# Altium PCB LSS-P-PCB-B v3.4.PcbDoc (part 3 of 3)
Units mil, origin at the board's own origin, x right, y up, seen from the top; angles counter-clockwise.
Board outline 2702.17 x 2795.23 mil, 4 copper layers (Top Layer, Power, GND, Bottom Layer), stack 62.08 mil thick; 111 components, 108 nets, 410 pads, 256 vias.
Unrouted connection lines stored in the file: 1.
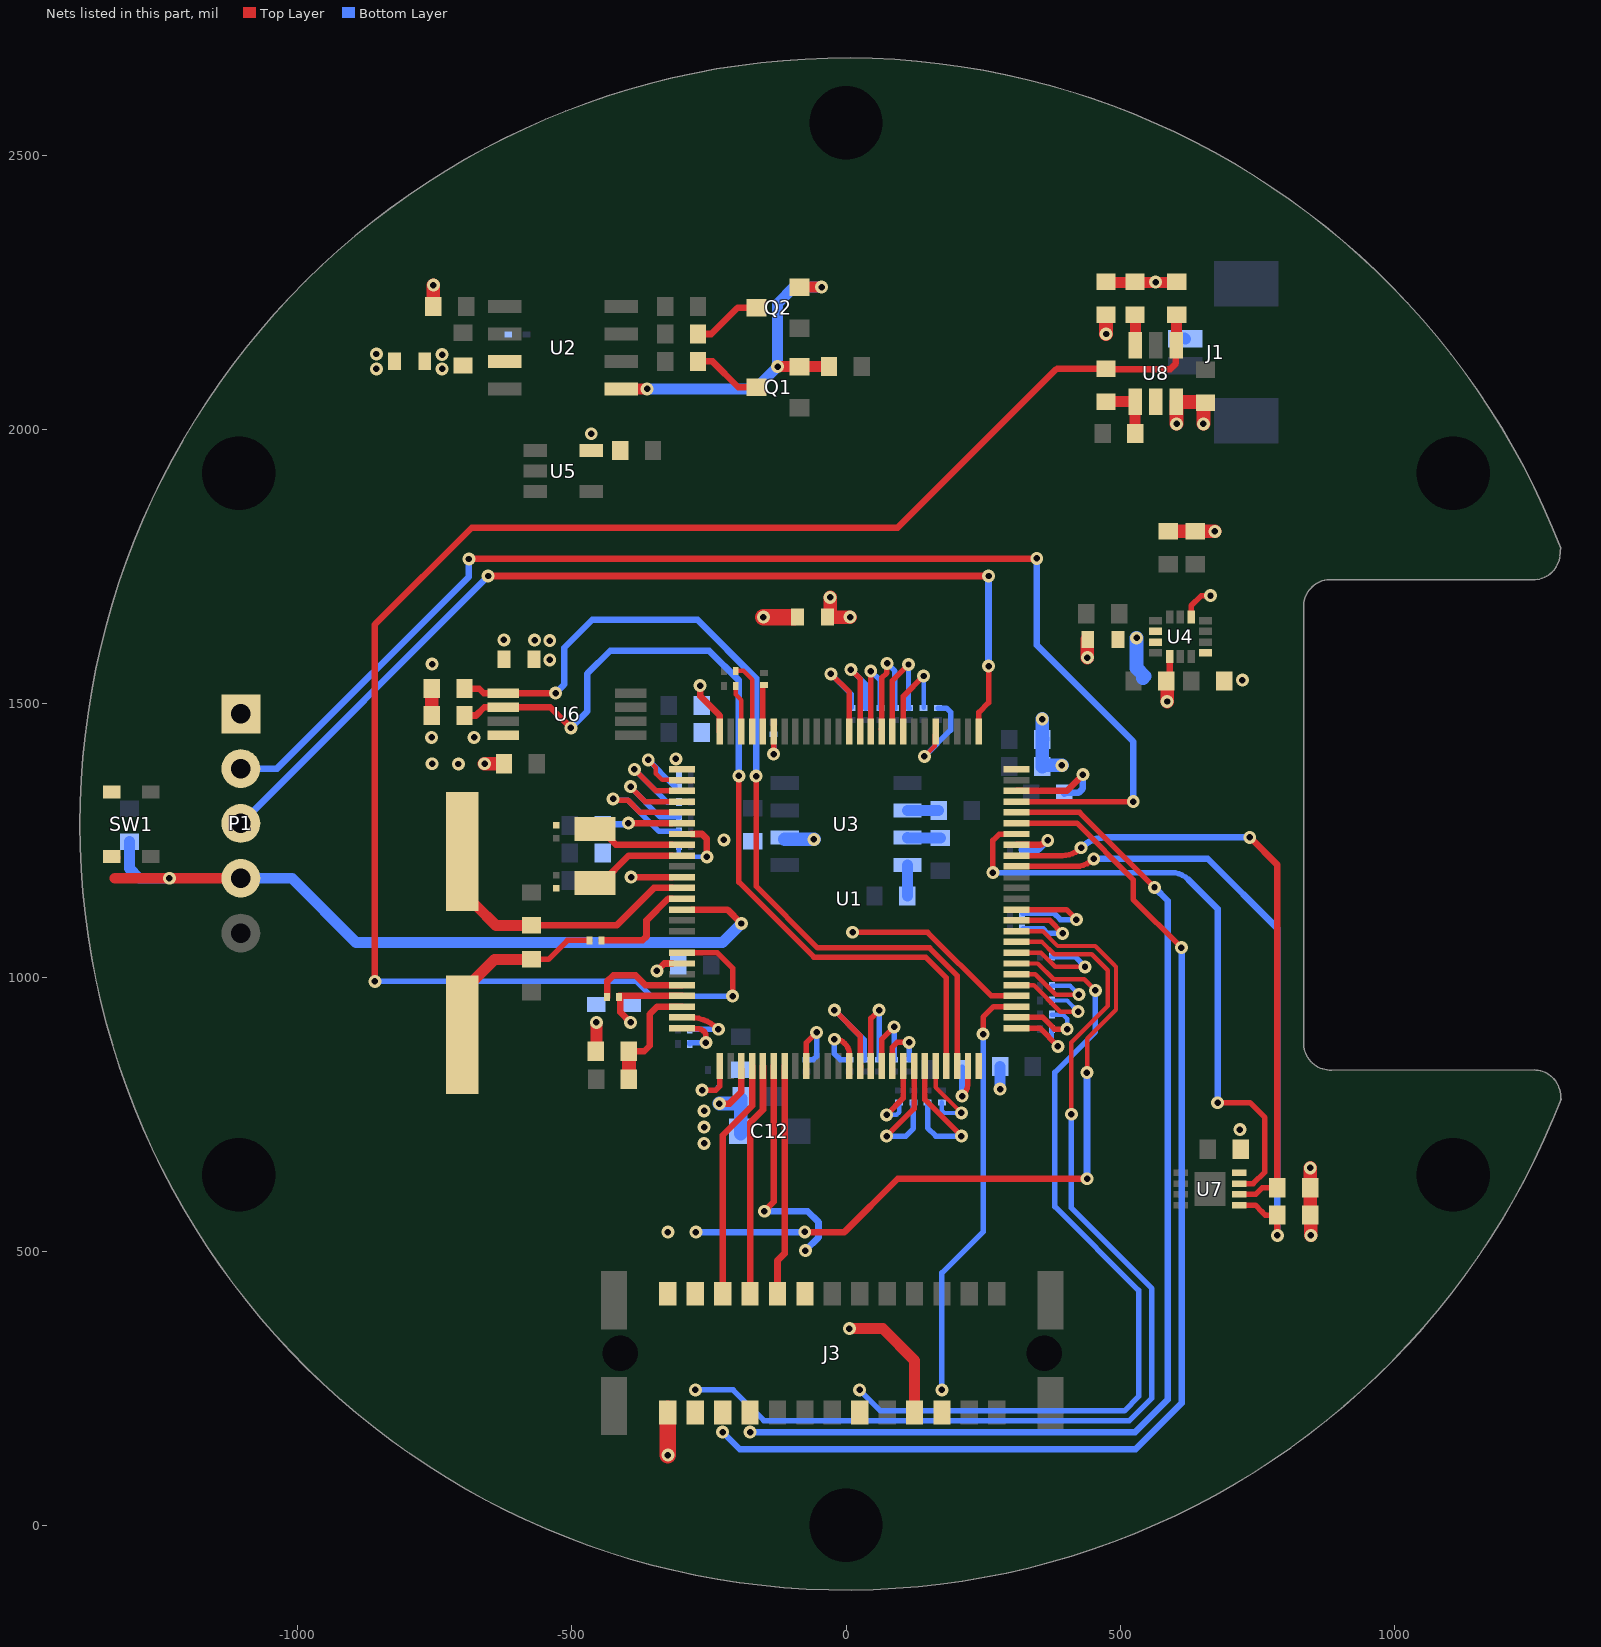
[diagram p4: the nets of this part, all layers, seen from the top]

## Via types
v1: diameter 23.62, hole 11.81, Top Layer to Bottom Layer, tented both sides, 256 vias

## Nets (pads, with @x,y where several pads share a name; then routed paths per layer and width w, separated by ;. In a path a pad name is that pad's centre, name@x,y a point inside that pad or via, vN(x,y) a via of type N, cw(c..) or ccw(c..) an arc to the next point about the centre after c; other vN are vias at no path point) (continued)
IN-: R50.1 R52.1 U8.4 | length 113.3
  Top Layer w20: R52.1@473,2050 R52.1@474.4,2050 474.47,2049.93 527.93,2049.93 U8.4@528,2049.87 527.5,2049.37 527.5,1992.5 R50.1@527,1992
LED_B: J3.A8 U1.57 | length 1534.3
  Top Layer w8: U1.57@311.12,1025.05 349.95,1025.05 378.81,996.19 434.66,996.19 v1(454.85,976)
  Bottom Layer w10: v1(25,246.98) 62.98,209.01 507.64,209.01 534,235.37 534,428.6 380.97,581.63 380.97,826.55 454.85,900.43 v1(454.85,976)
LED_G: J3.B2 U1.60 | length 1375.7
  Top Layer w8: U1.60@307.16,1084.1 U1.60@311.12,1084.1 358.9,1084.1 386,1057 454.85,1057 488,1023.85 488,1023.47 492.66,1018.82 492.66,940.66 440,888 v1@440,826.04
  Top Layer w12: v1(-75.3,535.3) -75,535 -3,535 94.31,632.31 v1(439.8,632.31)
  Bottom Layer w12: v1(-274,535) -75.3,535 v1(-75.3,535.3) ; v1(439.8,632.31) 439.71,632.41 439.71,825.95 v1@439.8,826.04
  other v1: 439.61,826.04
LED_R: J3.A2 U1.59 | length 1930.3
  Top Layer w8: U1.59@311.12,1064.42 357.37,1064.42 379.79,1042 448.26,1042 477.66,1012.6 477.66,947.47 411,880.81 v1(411,750)
  Bottom Layer w10: v1(-275,246.98) -205.89,246.98 -149.91,191 517,191 558,232 558,432 411,579 v1(411,750)
MISO: J3.B6 U1.31 | length 441.1
  Top Layer w12: v1(-149,573) -131.8,590.2 U1.31@-131.8,838.04
  Bottom Layer w12: v1(-149,573) -70,573 -50.19,553.19 -50.19,525.31 v1(-74.25,501.25)
MOSI: J3.B5 U1.32 | length 420.9
  Top Layer w12: J3.B5@-125,422.53 -125,483.1 -112.11,495.99 U1.32@-112.11,838.04
NetC13_2: C13.2 U1.49 | length 113.7
  Top Layer w10: v1@212,785.35 v1(212,783.21) ccw(c186.57,808.65) 222.54,808.65 U1.49@222.54,838.04
  Bottom Layer w10: C13.2@212,835.53 C13.2@216,831.53
  Bottom Layer w12: v1(212,783.21) C13.2@212,831.53
NetC14_2: C14.2 U1.73 | length 196.7
  Top Layer w12: U1.73@311.12,1340.01 402.67,1340.01 v1(432.19,1369.53)
  Bottom Layer w12: C14.2@398,1334.53 399.65,1336.18 423.97,1336.18 432.19,1344.4 v1(432.19,1369.53)
NetC17_2: C17.2 R3.2 X1.2 | length 349.7
  Top Layer w10: C17.2@-574,1032.53 -543.12,1032.53 -508.31,1067.34 R3.2@-467.85,1067.34
  Top Layer w20: X1.2@-700,894.88 -700,973.62 -641.09,1032.53 C17.2@-574,1032.53
NetQ1_3: Q1.3 R7.1 | length 126.1
  Top Layer w12: R7.1@-270,2123.53 -243.53,2123.53 -196.53,2076.53 Q1.3@-163.37,2076.53
NetQ2_3: Q2.3 R8.1 | length 124.5
  Top Layer w12: R8.1@-270,2173.53 -245.74,2173.53 -197.74,2221.53 Q2.3@-165.34,2221.53
NetR1_1: R1.1 U1.21 | length 177.5
  Top Layer w12: R1.1@-435.83,963.53 -435.83,992.17 -424.47,1003.53 -384.09,1003.53 -366.24,985.68 U1.21@-299.12,985.68
NetR6_1: R6.1 U1.51 | length 125.1
  Top Layer w10: U1.51@311.12,906.94 353.7,906.94 v1(386.64,874)
  Bottom Layer w8: R6.1@375.65,905.4 375.65,884.98 v1(386.64,874)
NetR9_2: R9.2 U1.24 | length 124
  Top Layer w10: U1.24@-299.12,926.62 -285.2,926.62 cw(c-285.2,852.8) v1@-233,905 ; v1@-233.84,910.65 v1@-233.77,910.58
  Bottom Layer w10: R9.2@-285,905.03 v1@-233.03,905.03
  other v1: -232.77,905.03
NetR10_2: R10.2 U1.25 | length 80
  Top Layer w10: U1.25@-285,906 -271.07,906 cw(c-271.07,888.93) -259,901 cw(c-267.25,892.75) -255.58,892.75 v1(-255.58,880.53)
  Bottom Layer w10: R10.2@-285,878.53 -285,880.21 -284.68,880.53 v1(-255.58,880.53)
NetR11_2: R11.2 U1.26 | length 129.8
  Top Layer w8: U1.26@-230.22,831.04 U1.26@-230,830.82
  Top Layer w10: v1(-262.59,793.93) -237.41,793.93 -230,801.34 U1.26@-230,830.82
  Bottom Layer w8: v1(-262.59,793.93) -239.07,793.93 -230.31,802.69 -230.31,827.76 -230.22,827.84 R11.2@-230.22,831.04
NetR12_1: R12.1 U1.52 | length 150.7
  Top Layer w10: U1.52@311.12,926.62 359.13,926.62 380.35,905.4 v1(403.33,905.4)
  Bottom Layer w8: R12.1@375.65,931.66 396.04,931.66 403.33,924.38 v1(403.33,905.4)
NetR13_2: R13.2 U1.34 | length 134.2
  Top Layer w10: U1.34@-72.74,838.04 -72.74,880.28 v1(-53.68,899.34)
  Bottom Layer w10: R13.2@-71.68,849.84 R13.2@-72,849.53 -59.85,849.53 -53.68,855.7 v1(-53.68,899.34)
NetR14_2: R14.2 U1.68 | length 116.2
  Top Layer w12: U1.68@311.12,1241.58 348.89,1241.58 ccw(c348.89,1268.63) v1(368.02,1249.51) v1@364.88,1249.51
  Bottom Layer w12: R14.2@321,1232.53 351.04,1232.53 v1(368.02,1249.51)
NetR17_2: R17.2 U1.80 | length 176.7
  Top Layer w8: v1(143,1403) 161.57,1421.57 161.57,1442.33 U1.80@164,1444.76
  Bottom Layer w10: v1(143,1403) 190.81,1450.81 190.81,1483.46 183.17,1491.1 R17.2@168,1491.1
NetR18_1: R18.1 U1.95 | length 78.2
  Top Layer w8: v1(-132,1407) -131,1408 v1@-131.8,1408.8
  Top Layer w10: v1@-131.8,1408.8 U1.95@-131.8,1448.28
  Bottom Layer w10: v1(-132,1407) R18.1@-132,1443.17
NetR19_2: R19.2 U1.7 | length 131.5
  Top Layer w12: U1.7@-281.5,1261.27 -262.74,1261.27 -253.81,1252.34 v1(-253.81,1219.72)
  Bottom Layer w8: R19.2@-304.83,1239.53 -304.83,1225.36 -299.19,1219.72 v1(-253.81,1219.72)
NetR20_2: R20.2 U1.97 | length 130.1
  Top Layer w8: R20.2@-200,1559 -187,1559 -170.83,1542.83 U1.97@-170.83,1448.61
NetR21_2: R21.2 U1.98 | length 87.2
  Top Layer w8: R21.2@-201.17,1531 -201.17,1515.72 -191,1505.54 U1.98@-191,1448
NetR22_1: R22.1 U1.83 | length 172.9
  Top Layer w10: U1.83@104.43,1450.1 104.43,1512.29 v1(141.67,1549.53)
  Bottom Layer w8: R22.1@141.67,1491.53 v1(141.67,1549.53)
NetR23_2: R23.2 U1.1 | length 3.6
  Bottom Layer w8: v1@-309.4,1394.9 v1@-309.4,1398.46
  other v1: -310.4,1398.46
NetR24_1: R24.1 U1.84 | length 212
  Top Layer w10: U1.84@84.74,1451.27 84.74,1541.27 v1(114,1570.53)
  Bottom Layer w10: v1(114,1570.53) 114,1491.42 114.32,1491.1 R24.1@115.33,1491.1
NetR25_2: R25.2 U1.2 | length 151.7
  Top Layer w8: v1(-360.78,1396.37) -347.01,1382.6 -347.01,1371.54 -335.47,1360 U1.2@-300.03,1360
  Bottom Layer w10: v1(-360.78,1396.37) -315.41,1351 -314,1351 -312.73,1349.73 -312.73,1347.73
NetR26_1: R26.1 U1.85 | length 212
  Top Layer w10: U1.85@64,1452.53 65.06,1453.58 65.06,1545.62 74.52,1555.09 74.52,1572.29 v1(74.88,1572.65)
  Bottom Layer w10: v1(74.88,1572.65) 89,1558.52 R26.1@89,1491.1
NetR28_2: R28.2 U1.3 | length 214.5
  Top Layer w10: v1(-386,1379) -347.01,1340.01 U1.3@-292.41,1340.01
  Bottom Layer w10: v1(-386,1379) -326.24,1319.24 R28.2@-306.01,1319.24
NetR29_1: R29.1 U1.86 | length 184.8
  Top Layer w10: U1.86@45.37,1448.28 v1@45.37,1558.3
  Bottom Layer w10: v1(45.08,1558.59) 62.67,1541.01 R29.1@62.67,1491.1
NetR30_2: R30.2 U1.4 | length 224.7
  Top Layer w10: v1(-392.96,1347.91) -393.28,1347.6 -393.28,1346.94 -366.66,1320.32 U1.4@-292.63,1320.32
  Bottom Layer w10: v1(-392.96,1347.91) -393.28,1347.6 -393.28,1346.94 -339,1292.67 -305.15,1292.67 R30.2@-305,1292.81
NetR31_1: R31.1 U1.87 | length 196.7
  Top Layer w10: v1(9,1561) 26,1544 U1.87@26,1452.53
  Bottom Layer w10: v1(9,1561) 36.33,1533.67 R31.1@36.33,1491.1
NetR32_2: R32.2 U1.5 | length 270.3
  Top Layer w10: v1(-425,1325.24) -422.95,1323.19 -398.19,1323.19 -375.64,1300.64 U1.5@-309.57,1300.64
  Bottom Layer w10: v1(-425,1325.24) -422.95,1323.19 -398.19,1323.19 -341.1,1266.1 R32.2@-304.83,1266.1
NetR33_1: R33.1 U1.88 | length 193.1
  Top Layer w10: v1(-27.52,1553.52) 6,1520 6,1452.53 U1.88@5,1451.53
  Bottom Layer w10: v1(-27.52,1553.52) 10,1516 R33.1@10,1492.27
NetR34_2: R34.2 U1.38 | length 122.4
  Top Layer w10: v1(-21.09,886.85) cw(c-21.09,859.75) 6,859.56 6,859.5 U1.38@6,838.04
  Bottom Layer w10: v1(-21.09,886.85) -21.09,860.17 -10.45,849.53 R34.2@6,849.53
NetR35_1: R35.1 U1.55 | length 189
  Top Layer w8: U1.55@311.12,985.68 342.32,985.68 390.79,937.21 v1(423.64,937.21)
  Bottom Layer w8: R35.1@375.65,957.53 403.33,957.53 v1(423.64,937.21)
NetR36_2: R36.2 U1.39 | length 242.3
  Top Layer w10: v1(-21.09,940) 25.68,893.22 U1.39@25.68,838.04
  Top Layer w12: U1.39@25.68,831.04 U1.39@25.68,838.04
  Bottom Layer w8: R36.2@33,850.84 33.25,850.59 R36.2@33.25,849.53
  Bottom Layer w10: v1(-21.09,940) 33,885.91 R36.2@33,849.84
NetR37_1: R37.1 U1.56 | length 183.8
  Top Layer w8: U1.56@312.08,1005.53 345.27,1005.53 382.6,968.19 424.49,968.19 v1(424.71,968.41)
  Bottom Layer w8: R37.1@375.65,984.19 408.92,984.19 v1(424.71,968.41)
NetR38_2: R38.2 U1.40 | length 205.7
  Top Layer w10: U1.40@45.46,831.13 45.46,924.96 v1(60.5,940)
  Top Layer w12: U1.40@45.37,831.04 U1.40@45.46,831.13
  Bottom Layer w10: R38.2@60.5,849.53 v1(60.5,940)
NetR39_1: R39.1 U1.96 | length 84.9
  Top Layer w10: U1.96@-151.48,1448.28 R39.1@-151.48,1533.17
NetR40_2: R40.2 U1.41 | length 147.5
  Top Layer w10: U1.41@65.06,831.04 65.06,886.65 v1(87.75,909.34)
  Bottom Layer w10: R40.2@87.75,849.53 v1(87.75,909.34)
NetR41_1: R41.1 U1.58 | length 203.6
  Top Layer w8: U1.58@311.12,1044.73 355.84,1044.73 381.57,1019 v1(436.01,1019)
  Bottom Layer w10: R41.1@375.65,1037.53 417.48,1037.53 434.99,1020.01 435.49,1019.51 v1(436.01,1019)
NetR42_2: R42.2 U1.42 | length 80.8
  Top Layer w10: U1.42@84.74,855.66 84.74,872.37 93.37,881 v1(115,881)
  Bottom Layer w10: R42.2@115,850.7 v1(115,881)
NetR43_2: R43.2 U1.43 | length 137.1
  Top Layer w10: v1(74,749) 104.43,779.43 U1.43@104.43,830.53
  Bottom Layer w8: v1(74,749) 92.31,749 97,753.69 R43.2@97,771.7
NetR44_2: R44.2 U1.44 | length 244.2
  Top Layer w10: v1(74,710.02) 124.06,760.07 U1.44@124.06,830.98
  Bottom Layer w10: v1(74,710.02) 109.02,710.02 123,724 R44.2@123,771.7
NetR45_1: R45.1 U1.61 | length 169.8
  Top Layer w10: U1.61@311.07,1103.53 371.73,1103.53 v1(395.27,1079.99)
  Bottom Layer w10: R45.1@323,1088.53 359.47,1088.53 368.01,1079.99 v1(395.27,1079.99)
NetR46_2: R46.2 U1.45 | length 270.2
  Top Layer w10: U1.45@143.8,838.04 143.8,776.82 v1(210.6,710.02)
  Bottom Layer w10: R46.2@149,771.7 149,725.06 164.04,710.02 v1(210.6,710.02)
NetR47_1: R47.1 U1.62 | length 221.4
  Top Layer w10: U1.62@311.12,1123.47 401.85,1123.47 v1(420.33,1105)
  Bottom Layer w8: R47.1@321,1116.53 321.84,1116.53 R47.1@322.31,1117
  Bottom Layer w10: R47.1@322.31,1117 379,1117 391,1105 v1(420.33,1105)
NetR48_2: R48.2 U1.46 | length 157.4
  Top Layer w8: U1.46@163.48,838.04 163.48,799.47 v1(210.6,752.36)
  Bottom Layer w8: R48.2@175,771.7 175,757.04 179.69,752.36 v1(210.6,752.36)
NetR49_1: R49.1 U8.3 | length 54.6
  Top Layer w20: U8.3@528,2153.02 528.2,2153.22 528.2,2207.24 R49.1@528.4,2207.44
NetRx1_1: Rx1.1 U3.2 | length 57.2
  Bottom Layer w20: U3.2@112.01,1304.53 112.27,1304.26 168.74,1304.26 Rx1.1@169,1304
NetRx2_1: Rx2.1 U3.3 | length 60.2
  Bottom Layer w20: U3.3@112.01,1254.53 112.27,1254.26 171.74,1254.26 Rx2.1@172,1254
NetRx3_1: Rx3.1 U3.4 | length 56.5
  Bottom Layer w20: Rx3.1@112,1148 U3.4@112.01,1204.53
NRST: C15.1 P1.4 SW1.1 SW1.2 U1.14 | length 1438
  Top Layer w12: U1.14@-281.5,1123.47 -216.47,1123.47 v1(-191,1098)
  Top Layer w20: SW1.1@-1335.5,1219.94 SW1.1@-1333.68,1218.13 ; -1333.68,1180.53 v1(-1234.51,1180.53) P1.4@-1104,1180.53
  Bottom Layer w20: C15.1@-1307.5,1247.53 -1307.5,1198.03 -1290,1180.53 v1(-1234.51,1180.53) ; P1.4@-1104,1180.53 -1011,1180.53 -893.81,1063.34 -225.66,1063.34 v1@-191.69,1097.31
OSCIN: C18.2 U1.8 X2.1 | length 152
  Top Layer w12: X2.1@-468.6,1276.97 X2.1@-462,1270.37 ; X2.1@-446.25,1270.37 -430.6,1254.72 -430.6,1252.6 -419.58,1241.58 U1.8@-316.74,1241.58
OSCOUT: C19.2 U1.9 X2.2 | length 163.8
  Top Layer w12: X2.2@-471.6,1162.35 X2.2@-462,1171.95 ; X2.2@-446.25,1171.95 -396.3,1221.9 U1.9@-316.74,1221.9
PA0: R16.2 R53.2 U1.23 | length 215.6
  Top Layer w12: R16.2@-396.19,865 -368,865 -358,875 -358,932.62 -344.31,946.31 U1.23@-299.12,946.31
  Top Layer w20: R16.2@-396.19,865 R16.2@-396.1,864.9 ; R53.2@-396.1,814.1 R53.2@-396,814
  Top Layer w25: R53.2@-396.1,814.1 R16.2@-396.1,864.9
SCLK_: RF4.2 U1.67 U7.6 | length 1167.1
  Top Layer w10: U1.67@311.12,1221.9 394.4,1221.9 ccw(c394.4,1270.68) v1@428.87,1236.16 ; U7.6@717.54,603.69 747.17,603.69 759.48,616 RF4.2@787,616
  Top Layer w12: v1@736.79,1255.21 787,1205 RF4.2@787,618
  Bottom Layer w12: v1(428.89,1236.19) cw(c474.31,1190.77) 474.31,1255 v1(736.58,1255) v1@736.79,1255
SCLK_TEMP: R27.1 U1.47 U6.6 | length 1623.4
  Top Layer w10: v1(-195.46,1367.5) -195.46,1173.35 -58.77,1036.66 145.29,1036.66 183.17,998.79 U1.47@183.17,838.04
  Top Layer w12: R27.1@-696,1477.47 -675,1477.47 -659.83,1492.64 -539.64,1492.64 v1(-502,1455)
  Bottom Layer w12: v1(-502,1455) -472,1485 -472,1554 -430.26,1595.74 -249.74,1595.74 -195.46,1541.46 v1(-195.46,1367.5)
SDA_: RF5.2 U1.66 U7.5 | length 1206.2
  Top Layer w10: U1.66@311.12,1202.21 418.72,1202.21 ccw(c418.72,1249.28) v1(452,1216) ; U7.5@717.54,584 747,584 759,572 759,571.86 764.86,566 RF5.2@787,566
  Top Layer w12: v1(787,529) RF5.2@787,566
  Bottom Layer w12: v1(452,1216) 660,1216 787,1089 v1(787,529)
SDA_TEMP: R2.1 U1.48 U6.5 | length 1652.7
  Top Layer w10: v1(-164.12,1366.93) -164.12,1166.06 -51.72,1053.66 152.33,1053.66 202.85,1003.15 U1.48@202.85,838.04
  Top Layer w12: R2.1@-696,1526.47 -669,1526.47 -660.76,1518.23 U6.5@-625.14,1518.23 v1(-529.99,1518.23)
  Bottom Layer w12: v1(-529.99,1518.23) -514,1534.22 -514,1601 -463,1652 -271,1652 -164.06,1545.06 v1@-164.06,1366.99
SPI_CS: J3.B3 U1.29 | length 452.4
  Top Layer w12: J3.B3@-225,407.9 J3.B3@-225,422.53 -225,711.53 -171.17,765.36 U1.29@-171.17,838.04
SPI_SCK: J3.B4 U1.30 | length 425.3
  Top Layer w12: J3.B4@-175,422.53 -175,734.66 -151.48,758.18 U1.30@-151.48,838.04
SPLIT: C37.1 Q1.2 Q2.2 U2.5 | length 643.5
  Top Layer w15: v1(-124.6,2114.07) v1@-124,2114.07
  Top Layer w20: U2.5@-409.7,2073.53 v1(-363,2073.53) ; v1@-123.96,2113.96 C37.1@-31.04,2113.96 ; Q2.2@-84.63,2258.93 v1(-44.4,2258.93)
  Bottom Layer w20: v1(-363,2073.53) -165.14,2073.53 v1(-124.6,2114.07) -124.6,2229.4 -95.07,2258.93 v1(-44.4,2258.93)
SWCLK: P1.3 U1.76 | length 1841.9
  Top Layer w10: U1.76@242.22,1448.28 242.22,1483.22 260,1501 v1(260,1567.72)
  Top Layer w12: v1(-653,1732) v1(260,1732)
  Bottom Layer w12: P1.3@-1104,1280.53 v1@-653,1731.53 ; v1(260,1567.72) v1(260,1732)
SWDIO: P1.2 U1.72 | length 2359.3
  Top Layer w10: U1.72@311.12,1320.32 v1(524,1320.32)
  Top Layer w12: v1(-688,1763) -687.5,1763.5 347.5,1763.5 v1(348,1764)
  Bottom Layer w12: P1.2@-1104,1380.53 -1037.96,1380.53 -688,1730.49 v1(-688,1763) ; v1(348,1764) 348,1605.84 524,1429.84 v1(524,1320.32)
TEMP_IN: J1.1 R15.2 R49.2 R51.1 | length 131
  Top Layer w20: R15.2@474.4,2267.44 528.4,2267.44 R51.1@603.4,2267.44
  Bottom Layer w20: J1.1@617.61,2166 J1.1@619.01,2164.61
  other v1: 565,2268
TEMP_OUT: R51.2 R52.2 U1.18 U8.1 | length 3216.2
  Top Layer w10: U1.18@-299.12,1044.73 -235.2,1044.73 -207,1016.53 v1@-207,963.53 ; U8.1@601.82,2150.86 U8.1@603.4,2152.44
  Top Layer w12: v1@-859.62,990.78 v1(-859.62,992.34) -859.62,1643.38 -683,1820 94,1820 382.48,2108.48 ; 385.13,2110 R52.2@474.4,2110 ; R52.2@474.96,2109.44 591.4,2109.44 601.82,2119.86 U8.1@601.82,2150.86
  Top Layer w20: U8.1@602.8,2153.02 603.1,2153.31 603.1,2207.14 R51.2@603.4,2207.44
  Bottom Layer w10: v1(-859.62,992.34) -382.34,992.34 -355.53,965.53 v1(-207,965.53)
TMC_1: J3.A11 U1.53 | length 780.2
  Top Layer w10: v1(250,896) 250,927 269.31,946.31 U1.53@311.12,946.31
  Bottom Layer w10: v1(175,246.98) 175,460.38 250,535.38 v1(250,896)
TMC_2: J3.A10 U1.54 | length 585.2
  Top Layer w10: v1(12,1082) 149,1082 265.01,965.99 U1.54@311.12,965.99
  Top Layer w20: v1(6,359) 67,359 125,301 J3.A10@125,205.99
USB_DM: J3.A3 U1.70 | length 2132.3
  Top Layer w10: U1.70@311.12,1280.95 421.05,1280.95 524,1178 524,1141.81 v1(611.81,1054)
  Bottom Layer w12: v1(-225,170) -193.69,138.69 528.13,138.69 612.19,222.74 612.19,1053.62 v1(611.81,1054)
USB_DP: J3.A4 U1.71 | length 2038.1
  Top Layer w10: U1.71@311.12,1300.64 426.04,1300.64 v1(562.79,1163.88)
  Bottom Layer w12: v1@-173.79,170 527.45,170 587,229.55 587,1139.67 v1(562.79,1163.88)
  other v1: -175,170
VCC_5V: FB3.1 J3.A1 | length 84.6
  Top Layer w30: v1(-325,128) J3.A1@-325,205.99 J3.A1@-325,212.64
  other v1: -856.68,2110 -856.68,2137
VCC_5V#: C36.1 D12.1 FB3.2 U2.3
  other v1: -737,2110 -737,2136
VDD_3V3: C1.1 C2.1 C3.1 C4.1 C5.1 C6.1 C7.1 C8.1 C9.1 C10.1 C11.1 C12.1 C21.1 C22.1 CF1.1 FB1.1 FB2.1 FB4.1 J3.B1 L1.1 P1.1 R4.2 R15.1 R16.1 RF4.1 RF5.1 U1.6 U1.11 U1.19 U1.28 U1.50 U1.75 U1.100 U5.5 U7.8 U8.5 U8.6 | length 1166.4
  Top Layer w12: v1(-397,1280.95) U1.6@-316.74,1280.95 ; v1(-392,1182.53) U1.11@-316.74,1182.53 ; v1(-345,1011.49) -331.44,1025.05 U1.19@-316.74,1025.05 ; v1(-266,1532) -266,1513 -230.22,1477.22 U1.100@-230.22,1448.28 ; v1(-231,769.53) -212.47,769.53 -190.94,791.06 -190.94,830.95 U1.28@-190.85,831.04
  Top Layer w22: R16.1@-455.48,865.71 v1(-455.48,917.53)
  Top Layer w25: R4.2@-753,2223.53 v1(-753,2262.53) ; v1(440.23,1583) FB2.1@440.23,1616.15 ; v1(474.4,2173.52) R15.1@474.4,2207.44 ; v1@602.8,2009.8 U8.6@602.8,2049.23 ; U8.6@602.8,2049.87 U8.6@602.8,2049.23 ; U8.6@603.1,2048.93 U8.6@602.8,2049.23 ; U8.6@603.12,2049.55 C21.1@654.45,2049.55 ; v1(652.13,2009.5) 652.13,2045.5 654.63,2048 C21.1@656,2048 ; v1(847,652) RF4.1@847,616 RF5.1@847,566 848,565 v1(848,529)
  Top Layer w30: v1(-150.69,1656.93) FB1.1@-94.5,1656.93
  Bottom Layer w12: C1.1@-444,1276.53 -441.79,1278.74 -399.21,1278.74 v1(-397,1280.95) ; C10.1@-197.19,770.84 C10.1@-192,776.03
  Bottom Layer w20: v1(281,796) C4.1@281,837
  Bottom Layer w25: v1(-231,769.53) -198.5,769.53 C10.1@-197.19,770.84 ; C12.1@-192,715 -192,776.03 C10.1@-192,778.53 ; C3.1@358,1434.53 v1(358,1471) ; C3.1@359,1434.53 C3.1@358,1433.53 C9.1@358,1384.16 360.37,1386.53 v1(394,1386.53)
  other v1: -325,535 -259,697 718.51,722 -259,726.5 -259,756 -540.5,1579 -540.5,1614 -568,1615 -464.82,1991.53 603.1,2009.5
VDD_3V3#: C33.1 C34.1 FB2.2 RF2.2 RF3.2 U4.2 U4.3 U4.5 U4.8 U4.12 | length 310.5
  Top Layer w10: U4.12@629.86,1656.98 629.86,1677.86 648.17,1696.17 v1(665,1696.17) ; C34.1@680.01,1542.04 C34.1@681.5,1540.56
  Top Layer w12: C33.1@590.49,1544.83 U4.5@590.49,1585.32
  Top Layer w25: v1(586,1503) C33.1@586,1541.81 ; RF3.2@588,1813.53 RF2.2@637,1813.53 v1(673,1813.53)
  Bottom Layer w25: v1(530,1619) 530,1564 545,1549 542,1546
  other v1: 723,1542.04
VDD_3V3_: C50.1 FB4.2 R2.2 R27.2 U6.8 | length 90.1
  Top Layer w25: R27.2@-756,1477.47 R2.2@-756,1526.47 ; R2.2@-755,1526.47 -755,1529.97 R2.2@-753.5,1531.47 ; v1(-659.53,1389.47) C50.1@-624,1389.47
  other v1: -707.26,1389 -755,1389.47 -756,1437.6 -678.47,1437.6 -755,1571.35 -624.06,1615.53
VDD_ENC: C20.1 FB1.2 U3.6 | length 115.5
  Top Layer w25: FB1.2@-29,1664.5 v1(-29,1693) ; FB1.2@-26.07,1657 v1(7.43,1657)
  Bottom Layer w25: U3.6@-112.01,1251.53 v1(-58.53,1251.53)
  other v1: -222.82,1250.49
VDDA: L1.2 R1.2 U1.22 | length 168.2
  Top Layer w12: R1.2@-413.4,965.9 -299.21,965.9 U1.22@-299.12,965.99 ; R1.2@-412,963.53 -412,936.53 v1(-393,917.53)
WP#: U1.69 U7.7 | length 1147.8
  Top Layer w10: v1(268,1191) 268,1249.53 279.74,1261.27 U1.69@311.12,1261.27 ; v1(678,771) 737,771 764,744 764,644.56 742.81,623.37 U7.7@717.54,623.37
  Bottom Layer w10: v1(268,1191) 593.62,1191 cw(c593.62,1146.62) 624.97,1178.03
  Bottom Layer w12: 625,1178 678,1125 v1(678,771)
XIN: C16.2 U1.12 X1.1 | length 531.7
  Top Layer w12: C16.2@-574,1094.53 -418.63,1094.53 -350.31,1162.84 U1.12@-316.74,1162.84
  Top Layer w20: X1.1@-705,1245.53 -705,1155.79 -680.47,1131.26 -675.55,1131.26 -638.82,1094.53 C16.2@-574,1094.53
XOUT: R3.1 U1.13 | length 177.3
  Top Layer w12: R3.1@-445.51,1067.34 -371.03,1067.34 -364,1074.37 -364,1103.67 -324.52,1143.16 U1.13@-316.74,1143.16
pads on no net: J1.MP1 J1.MP2 J3.B11 J3.MH1 J3.MH2 U3.1 U3.5 U3.8 U4.10 U4.11 U5.1

## Polygon pours and split planes (outlines as drawn)
GND on Bottom Layer "GND_L04_P000" (solid, remove dead copper, pour order 0): -268,1232.24 -290.09,1232.24 -290.09,1239.04 -290.09,1239.46 -290.09,1240.02 -290.09,1400.53 -222.68,1400.53 -222.68,1375.31 -227.25,1370.75 -268,1370.75 -268,1234.16
GND on GND (split plane): 310 vertices, not listed, extent -1377.64,-98.11 1283.86,2657.16
VCC_5V on Power (split plane): -818.07,2041 -818.07,1665 -818.07,1618 -818.07,554 -817.78,551.06 -816.93,548.23 -815.53,545.63 -813.66,543.34 -456.02,185.71 -453.74,183.83 -451.13,182.44 -448.3,181.58 -445.36,181.29 -290.07,181.29 -290.07,91.07 -504.76,91.07 -941.93,528.24 -941.93,2174.46 -818.07,2174.46
VDD_3V3 on Power (split plane): 310 vertices, not listed, extent -1377.64,-98.11 1283.86,2657.16
VDD_3V3_ on Power (split plane): -608.07,1343.07 -783.23,1343.07 -787.93,1347.77 -787.93,1649.93 -608.07,1649.93
VDD_ENC on Power (split plane): 52.93,1181.69 52.63,1181.53 50.34,1179.66 48.47,1177.37 47.07,1174.77 46.22,1171.94 45.93,1169 46.22,1166.06 46.82,1164.07 -55.11,1164.07 -55.13,1164.07 -55.15,1164.07 -259.93,1164.07 -259.93,1375.75 -101.34,1534.34 -99.47,1536.63 -98.07,1539.23 -97.22,1542.06 -96.93,1545 -96.93,1725.46 52.93,1725.46
BOOT0 on Power (split plane): -69.69,324.07 -174.04,324.07 -173.99,1133.93 -70.18,1133.93
TMC_2 on Power (split plane): 52.93,1091.52 52.93,438 52.93,324.07 -39.54,324.07 -40.04,1133.93 52.93,1133.93
DRV_ENN on Power (split plane): 234.93,453.07 83.07,453.07 83.07,1162 83.07,1534.46 234.93,1534.46
VDD_3V3# on Power (split plane): 768.93,1453.01 492.36,1453.01 492.36,1846.93 768.93,1846.93

## Other copper
Top Layer:
  region net VDD_3V3: 298.47,835 263,835 263,781 298.47,781
  rectangle net EN_DATA: -58,1424 -28,1472
  region net GND: -556.5,1144 -556.5,1193 -592,1193 -592,1144
  rectangle net GND: -592,1177 -514,1259.25
  rectangle net OSCOUT: -536,1147.32 -421,1168.32
  rectangle net OSCIN: -536,1271 -487,1292
  region net USB_DM: -209,226.99 -241,226.99 -241,151.36 -209,151.36
  region net USB_DP: -159,226.99 -191,226.99 -191,150.35 -159,150.35
  region net LED_B: 41,261.99 9,261.99 9,185 41,185
  region net VDD_3V3#: 736.77,1522.84 736.77,1559.14 668.76,1559.14 668.76,1522.84
  region net VDD_3V3#: 705,1577.52 705,1597.31 643.77,1597.31 643.77,1577.52
  region net GND: 636,1573.5 636,1630.5 607.67,1630.5 607.67,1573.5
  rectangle net VDD_3V3#: 480,1596 515,1636
  region net VDD_3V3#: 575.95,1616.21 575.95,1636 507.93,1636 507.93,1616.21
  rectangle net GND: 584,1605 636,1637
  rectangle net NetR1_1: -445.65,951.53 -428.65,975.53
  rectangle net NetR10_2: -323,898 -275,913
  region net GND: 469,457 349,457 349,356 469,356
  region net CAN_IN.CAN_NH#: -59,263 -91,263 -91,184.99 -59,184.99
  region net CAN_IN.CAN_NL#: -109,263 -141,263 -141,184.99 -109,184.99
  region net TMC_1: 191,261.99 159,261.99 159,185 191,185
  region net VDD_3V3: -308.75,551 -342.75,551 -342.75,400.87 -308.75,400.87
  rectangle net GND: 636.2,2089.28 706,2129
  rectangle net TEMP_IN: 456.9,2253.44 620.9,2283.44
  rectangle net VDD_3V3: 553.2,2021.28 673.5,2073.88
  rectangle net GND: -462.05,1371.75 -424.05,1548
  region net GND: -579,1409.33 -579,1371.33 -427.05,1371.33 -427.05,1409.33
  region net VDD_3V3_: -774,1450.31 -774,1371.47 -596.6,1371.47 -596.6,1450.31
  region net VDD_3V3: -524,1631 -580.75,1631 -580.75,1559 -524,1559
  region net VDD_3V3_: -596.6,1450.47 -774,1450.47 -774,1418.82 -596.6,1418.82
  region net VDD_3V3_: -736,1599.75 -774,1599.75 -774,1418.84 -736,1418.84
  rectangle net GND: 631,644.24 675,739
  rectangle net VDD_3V3#: 568,1792 700,1833
  rectangle net VDD_3V3#: 668,1523.31 709,1597.1
  rectangle net VDD_3V3: 426.56,1597 454.88,1631.75
  region net GND: 502,429 441.5,489.5 409,457 469.5,396.5
  region net LED_R: -259,263 -291,263 -291,184.99 -259,184.99
  region net VDD_3V3: 865,667.53 829,667.53 829,515.53 865,515.53
  rectangle net NRST: -1355.18,1169.53 -1318.51,1351
  region net GND: -307,1548 -454,1548 -454,1425.47 -307,1425.47
  rectangle net NetR23_2: -326,1373.04 -288,1417
  rectangle net GND: 209.25,400 441.5,489.5
  rectangle net GND: -1286,1200 -1218,1240
  region net LED_G: -257.75,551 -291.75,551 -291.75,401 -257.75,401
  region net MISO: -58,516 -92,516 -92,401 -58,401
  rectangle net VDD_3V3#: 486,1606 576,1632
  region net GND: -554,2192 -718,2192 -718,2158.06 -554,2158.06
  rectangle net VDD_3V3: 725,656 739,738
  rectangle net VDD_3V3: 701,636.53 734,738
  rectangle net GND: 596,571.53 693,655.53
  rectangle net VDD_3V3_: -774,1559.75 -609,1631
  region net GND: 469,274.6 259.9,274.6 259.9,164 469,164
  rectangle net GND: -558,356 -395,467.52
  rectangle net GND: -558,242 -453,465
  rectangle net GND: 259,164 418.92,228.97
  rectangle net GND: -234,1523 -215,1571
  rectangle net VDD_3V3: -486.47,1943.43 -397.19,2015
  rectangle net GND: -717,2161 -676,2191
  region net VDD_3V3: -70,1638.56 -70,1674 -107,1674 -107,1638.56
  region net VDD_ENC: -46,1677 -46,1641 -11,1641 -11,1677
  rectangle net VDD_3V3: 287.5,1373 409,1404
  region net GND: -1251,1384 -1289,1384 -1289,1200 -1251,1200
  rectangle net VCC_5V: -880.68,2093 -807.68,2155
  rectangle net GND: 404,227 502,429
  rectangle net GND: -558,153 -369,271
  rectangle net VDDA: -421,951.53 -403,975.53
  region net VDD_3V3: 298.47,811.53 298.47,861.92 236.22,861.92 236.22,811.53
  rectangle net VCC_5V#: -788,2093.53 -591,2151
Bottom Layer:
  region net GND: 357.38,1024.74 284.06,1098.06 253,1067 326.32,993.68
  region net GND: 495,422 441,476 415.5,450.5 469.5,396.5
  region net GND: 495,223 495,422 403,422 403,223
  rectangle net GND: 211,400 441.5,476
  region net GND: 462,451 349,451 349,356 462,356
  region net GND: -487,1296.53 -569,1296.53 -569,1156.53 -487,1156.53
  rectangle net VDD_3V3: -462,1158.53 -374,1250.49
  region net VDD_3V3_: -776.38,1440.36 -776.38,1371.91 -661.38,1371.91 -661.38,1440.36
  region net VDD_3V3_: -661.38,1371.91 -610.07,1423.21 -642.51,1455.66 -693.82,1404.35
  rectangle net VDD_3V3: -366.02,997 -291.02,1041.34
  region net TEMP_IN: 619,2284 548,2284 548,2251 619,2251
  rectangle net GND: 587.51,2099.65 705.8,2131.14
  region net TEMP_IN: 626,2148.95 626,2284 587.26,2284 587.26,2148.95
  rectangle net GND: 319,817 362.83,1047.53
  region net VDD_ENC: -39.81,1232.24 -39.81,1267.53 -236.13,1267.53 -236.13,1232.24
  region net GND: -39.81,1285.38 -39.81,1328.03 -288.49,1328.03 -288.49,1285.38
  region net VDD_3V3_: -726.04,1630 -726.04,1564.25 -610,1564.25 -610,1630
  region net VDD_3V3_: -610.07,1579.74 -776.83,1579.74 -776.83,1423.21 -610.07,1423.21
  region net VDD_3V3_: -745.32,1548.68 -695,1599 -726.06,1630.06 -776.38,1579.74
  region net VDD_3V3#: 736.94,1567 509,1567 509,1523 736.94,1523
  region net GND: 688,582.82 688,739 631,739 631,582.82
  rectangle net VDD_3V3: 340,1365.53 376,1485.53
  rectangle net VDD_3V3: -472.48,901.53 -436.48,964.53
  region net VDD_3V3: -171.47,684 -171.47,773.84 -278,773.84 -278,684
  region net GND: 177,1457 177,1476.53 -26,1476.53 -26,1457
  rectangle net GND: -6,775 67,801
  rectangle net GND: -556,142 -374,188
  rectangle net GND: -82,816 162,833.7
  rectangle net NetR25_2: -319,1338 -298,1356
  rectangle net GND: -558,142 -453,465
  rectangle net GND: -558,356 -434.97,467.52
  region net VDD_3V3#: 561,1525.06 561,1635 509,1635 509,1525.06
  rectangle net GND: -592,2154 -548,2189.53
  rectangle net VCC_5V#: -750,2089 -608.98,2189.53
  region net VDD_3V3: -171,847 -214,847 -214,740 -171,740
  region net GND: -42,695 -42,736 -148,736 -148,695
  rectangle net GND: -149,695 -108,801.53
  rectangle net GND: 254,1316.53 325,1486
  rectangle net NetR14_2: 314,1224 329,1241
  rectangle net VDD_3V3: -285,1426.47 -246,1546
  rectangle net GND: -6,786.53 153,822
  region net GND: -308,1547 -454,1547 -454,1423 -308,1423
  rectangle net GND: 253,1028 308.17,1128
  rectangle net GND: -316,820 -244,850
  rectangle net GND: -349,820 -298.83,914
  rectangle net GND: 274,1316.53 325,1455.53
  region net GND: 189,786.53 189,896.53 137,896.53 137,786.53
  rectangle net VDDA: -410,901.53 -374,964.53
  rectangle net GND: -213,868.53 -143,916.53
  region net GND: -82,828 -82,816 -41.69,775.69 18,775.69 18,828
  region net NetR23_2: -324,1412.13 -297,1412.13 -297,1364 -310.5,1364 -324,1377.5
  region net GND: -108,801.53 -42.47,736 -42,736 -42,727 -42,709 -66,709 -111,709 -111,795
Power (plane layer: these items are gaps in the copper):
  lines w10: 68,1549.53 68,1562
  lines w30: -803,1341.53 -789.47,1328 -593,1328 -593,1665 -803,1665 -803,1618 ; -328,196.36 -328,309 68,309 68,438 ; -189.11,310 -189.06,1149 ; -55.12,1149 -54.61,311 ; 61,1169 68,1162 ; 68,1091.52 68,1162 ; 68,1549.53 250,1549.53 250,438 68,438 ; 68,438 68,1162 ; -957,522 -511,76 -275,76 -275,196.36 -445.36,196.36 -803,554 -803,2041 -803,2189.53 -957,2189.53 -957,522 ; -275,1149 68,1149 68,1740.53 -112,1740.53 -112,1545 -275,1382 -275,1149 ; 477.29,1437.93 784,1437.93 784,1862 477.29,1862 477.29,1437.93

## Silkscreen, mask and mechanical layers (free items; w line width, h text height)
Top Overlay:
  lines w5: -588,573.56 -531,573.56 -531,792 -588,792 -588,573.56 ; -544,1144 -544,1296 -511,1296 -511,1144 -544,1144
  lines w8: 432.33,2153.02 485.02,2153.02 506.4,2174.4 506.4,2190.44
  text "*" at 57,2093 h42
  text "*" at -712,2054 h42
  text "*" at 682,2033 h42 r270
  text "*" at -363,1982.47 h42
  text "#" at 651,1841 h42
  text "#" at 603,1840 h42
  text "#" at 412,1644 h42
  text "@" at -224,1577 h30
  text "#" at -811,1550.47 h42 r180
  text "*" at 468.69,1515.78 h42
  text "#" at -811,1497.47 h42 r180
  text "@" at -160,1487 h30
  text "@" at -223,1483 h30
  text "*" at 677,1475 h42
  text "3V3" at -1052,1445.69 h60
  text "SWDIO" at -1052,1348.69 h50
  text "*" at -576,1323 h42
  text "SWCLK" at -1052,1249.69 h50
  text "NRST" at -1052,1146.69 h50
  text "~" at -508.13,1104.1 h60 r90
  text "GND" at -1052,1041.69 h50
  text "PROGRAMMING" at -1158,1029.53 h65 r90
  text "RESET" at -1266,1006 h65 r90
  text "@" at -476.02,953.53 h30
  text "#" at -484,846 h42
  text "#" at -484,791.61 h42
  text "*" at 776,665 h42
  text "#" at 902,599.61 h42
  text "#" at 902,545.61 h42
  text "~" at -540.13,535.1 h60 r90
Bottom Overlay:
  drawing of 23 lines, arcs and shapes, not listed
  text "PT100" at 814,2012 h50 r270
  text "@" at -24.24,1507.43 h30
  text "@" at 6.04,1507.43 h30
  text "@" at 36.04,1507.43 h30
  text "@" at 67.04,1507.43 h30
  text "@" at 97.04,1507.43 h30
  text "@" at 127.04,1507.43 h30
  text "@" at 159.04,1507.43 h30
  text "@" at 190.21,1507.43 h30
  text "@" at -122,1483 h30
  text "*" at -355,1474 h42
  text "*" at -355,1426 h42
  text "*" at 269,1412.53 h42
  text "@" at -323,1392 h30 r90
  text "*" at 269,1371.53 h42
  text "@" at -323,1360 h30 r90
  text "@" at -323,1330 h30 r90
  text "@" at -323,1300 h30 r90
  text "@" at -323,1269 h30 r90
  text "@" at -323,1239 h30 r90
  text "@" at 359,1218 h30
  text "*" at -533,1202.81 h42
  text "*" at -1294,1185.53 h42
  text "*" at -156.99,1183.53 h42
  text "*" at -533,1155.53 h42
  text "@" at 360,1108 h30
  text "@" at 360,1069 h30
  text "*" at -294,1043.53 h42
  text "@" at 414,1024 h30
  text "@" at 335,974.19 h30
  text "@" at 415,953.33 h30
  text "@" at -285,951 h30
  text "@" at 415,913.06 h30
  text "*" at -177,910.16 h42
  text "@" at -325,906 h30
  text "@" at 335,887 h30
  text "@" at 7.51,868.23 h30
  text "@" at 38.51,868.23 h30
  text "@" at 68.51,868.23 h30
  text "@" at 98.51,868.23 h30
  text "@" at 130.51,868.23 h30
  text "@" at -63.35,866.18 h30
  text "@" at -326,865 h30
  text "@" at -270.35,820.18 h30
  text "*" at 398,816 h42
  text "*" at -76,760.53 h42
  text "@" at 106.51,724.23 h30
  text "@" at 137.51,724.23 h30
  text "@" at 167.51,724.23 h30
  text "@" at 197.51,724.23 h30
  text "LSS-P-PCB-B v3.4" at 308,518.02 h85
Board Outline:
  lines w15: 886.01,830.57 cw(c884,879.5) 835.4,885.52 835.41,1670.54 cw(c884,1676.55) 889.44,1725.22 ; 886.01,830.67 1255.51,830.94 ; 889.44,1725.12 1255.51,1725.12 ; 1257.51,1725.12 ccw(c1253.9,1773.96) 1302.74,1777.49 ; 1258.51,830.61 cw(c1254.9,781.78) 1303.74,778.24 ; 1303.84,1782.91 ccw(c0,1279.53) 1304.53,777.94
Mechanical 3:
  circle w15: c-1108.1,639.76 r62.99
  circle w15: c-1108.1,639.76 r118.11
  circle w15: c-1108.1,1919.29 r118.11
  circle w15: c-1108.1,1919.29 r62.99
  circle w15: c0,2559.06 r118.11
  circle w15: c0,2559.06 r62.99
  circle w15: c0,0 r118.11
  circle w15: c0,0 r62.99
  circle w15: c1108.1,639.76 r118.11
  circle w15: c1108.1,639.76 r62.99
  circle w15: c1108.1,1919.29 r118.11
  circle w15: c1108.1,1919.29 r62.99
Fabrication:
  drawing of 295 lines, arcs and shapes, not listed
  text "Layer" at 1673.74,1765 h60
  text "Name" at 2083.65,1765 h60
  text "Material" at 3013.4,1765 h60
  text "Thickness" at 3873.16,1765 h60
  text "Constant" at 4523,1765 h60
  text "Board Layer Stack" at 5092.86,1765 h60
  text "Top Overlay" at 2083.65,1645 h60
  text "Top Solder" at 2083.65,1525 h60
  text "Solder Resist" at 3013.4,1525 h60
  text "0.50mil" at 3873.16,1525 h60
  text "3.5" at 4523,1525 h60
  text "1" at 1673.74,1405 h60
  text "Top Layer" at 2083.65,1405 h60
  text "CF-005" at 3013.4,1405 h60
  text "1.70mil" at 3873.16,1405 h60
  text "Prepreg 1" at 2083.65,1285 h60
  text "PP-015" at 3013.4,1285 h60
  text "5.00mil" at 3873.16,1285 h60
  text "4.3" at 4523,1285 h60
  text "2" at 1673.74,1165 h60
  text "Power" at 2083.65,1165 h60
  text "CF-005" at 3013.4,1165 h60
  text "1.70mil" at 3873.16,1165 h60
  text "Core" at 2083.65,1045 h60
  text "FR-4" at 3013.4,1045 h60
  text "45.28mil" at 3873.16,1045 h60
  text "4.8" at 4523,1045 h60
  text "3" at 1673.74,925 h60
  text "GND" at 2083.65,925 h60
  text "CF-005" at 3013.4,925 h60
  text "1.70mil" at 3873.16,925 h60
  text "Prepreg 2" at 2083.65,805 h60
  text "PP-015" at 3013.4,805 h60
  text "5.00mil" at 3873.16,805 h60
  text "4.3" at 4523,805 h60
  text "4" at 1673.74,685 h60
  text "Bottom Layer" at 2083.65,685 h60
  text "CF-005" at 3013.4,685 h60
  text "1.70mil" at 3873.16,685 h60
  text "Bottom Solder" at 2083.65,565 h60
  text "Solder Resist" at 3013.4,565 h60
  text "0.50mil" at 3873.16,565 h60
  text "3.5" at 4523,565 h60
  text "Bottom Overlay" at 2083.65,445 h60
  text "Total board thickness:" at 1673.74,325 h60
  text "63.08mil" at 3873.16,325 h60
Drill Drawing:
  lines w10: 1666.73,2207.99 1700.07,2224.66 1733.4,2207.99 1716.73,2241.33 1733.4,2274.66 1700.07,2257.99 1666.73,2274.66 1683.4,2241.33 1666.73,2207.99 ; 1666.73,2357.99 1733.4,2357.99 1733.4,2424.66 1666.73,2424.66 1666.73,2357.99 ; 1666.73,2524.66 1683.4,2524.66 1700.07,2507.99 1716.73,2524.66 1733.4,2524.66 1716.73,2541.33 1733.4,2557.99 1716.73,2557.99 1700.07,2574.66 1683.4,2557.99 1666.73,2557.99 1683.4,2541.33 1666.73,2524.66 ; 1666.73,2724.66 1733.4,2724.66 1700.07,2657.99 1666.73,2724.66
  lines w15: 1606.94,2162.99 8956.93,2162.99 ; 1606.94,2762.99 8956.93,2762.99 ; 2157.82,2012.99 2157.82,2912.99 ; 2757.66,2012.99 2757.66,2912.99 ; 3907.32,2012.99 3907.32,2912.99 ; 4413.2,2012.99 4413.2,2912.99 ; 5147,2012.99 5147,2912.99 ; 6646.55,2012.99 6646.55,2912.99 ; 7236.4,2012.99 7236.4,2912.99 ; 7982.2,2012.99 7982.2,2912.99 ; 1606.94,2012.99 8956.93,2012.99 8956.93,2912.99 1606.94,2912.99 1606.94,2012.99
  text "Symbol" at 1696.94,2807.99 h72
  text "Count" at 2202.82,2807.99 h72
  text "Hole Size" at 2802.66,2807.99 h72
  text "Plated" at 3952.32,2807.99 h72
  text "Hole Type" at 4458.2,2807.99 h72
  text "Drill Layer Pair" at 5192,2807.99 h72
  text "Via/Pad" at 6691.55,2807.99 h72
  text "Pad Shape" at 7281.4,2807.99 h72
  text "Template" at 8027.2,2807.99 h72
  text "256" at 2202.82,2657.99 h60
  text "11.81mil (0.300mm)" at 2802.66,2657.99 h60
  text "PTH" at 3952.32,2657.99 h60
  text "Round" at 4458.2,2657.99 h60
  text "Top Layer - Bottom Layer" at 5192,2657.99 h60
  text "Via" at 6691.55,2657.99 h60
  text "Rounded" at 7281.4,2657.99 h60
  text "v60h30m0mx0" at 8027.2,2657.99 h60
  text "5" at 2202.82,2507.99 h60
  text "35.43mil (0.900mm)" at 2802.66,2507.99 h60
  text "PTH" at 3952.32,2507.99 h60
  text "Round" at 4458.2,2507.99 h60
  text "Top Layer - Bottom Layer" at 5192,2507.99 h60
  text "Pad" at 6691.55,2507.99 h60
  text "(Mixed)" at 7281.4,2507.99 h60
  text "(Mixed)" at 8027.2,2507.99 h60
  text "2" at 2202.82,2357.99 h60
  text "64.96mil (1.650mm)" at 2802.66,2357.99 h60
  text "NPTH" at 3952.32,2357.99 h60
  text "Round" at 4458.2,2357.99 h60
  text "Top Layer - Bottom Layer" at 5192,2357.99 h60
  text "Pad" at 6691.55,2357.99 h60
  text "Rounded" at 7281.4,2357.99 h60
  text "c0hn165m0mx0" at 8027.2,2357.99 h60
  text "6" at 2202.82,2207.99 h60
  text "133.86mil (3.400mm)" at 2802.66,2207.99 h60
  text "NPTH" at 3952.32,2207.99 h60
  text "Round" at 4458.2,2207.99 h60
  text "Top Layer - Bottom Layer" at 5192,2207.99 h60
  text "Pad" at 6691.55,2207.99 h60
  text "Rounded" at 7281.4,2207.99 h60
  text "c300hn340m0mx0" at 8027.2,2207.99 h60
  text "269 Total" at 2202.82,2057.99 h60